# Altium PCB OmniCore_SDR.PcbDoc (part 13 of 13)
Units mil, origin at the board's own origin, x right, y up, seen from the top; angles counter-clockwise.
Board outline 4724.72 x 2755.91 mil, 8 copper layers (Top, GND 1, Layer 1, Layer 2, GND 2, Layer 3, Power, Bottom), stack 40.468 mil thick; 530 components, 427 nets, 2315 pads, 1715 vias.
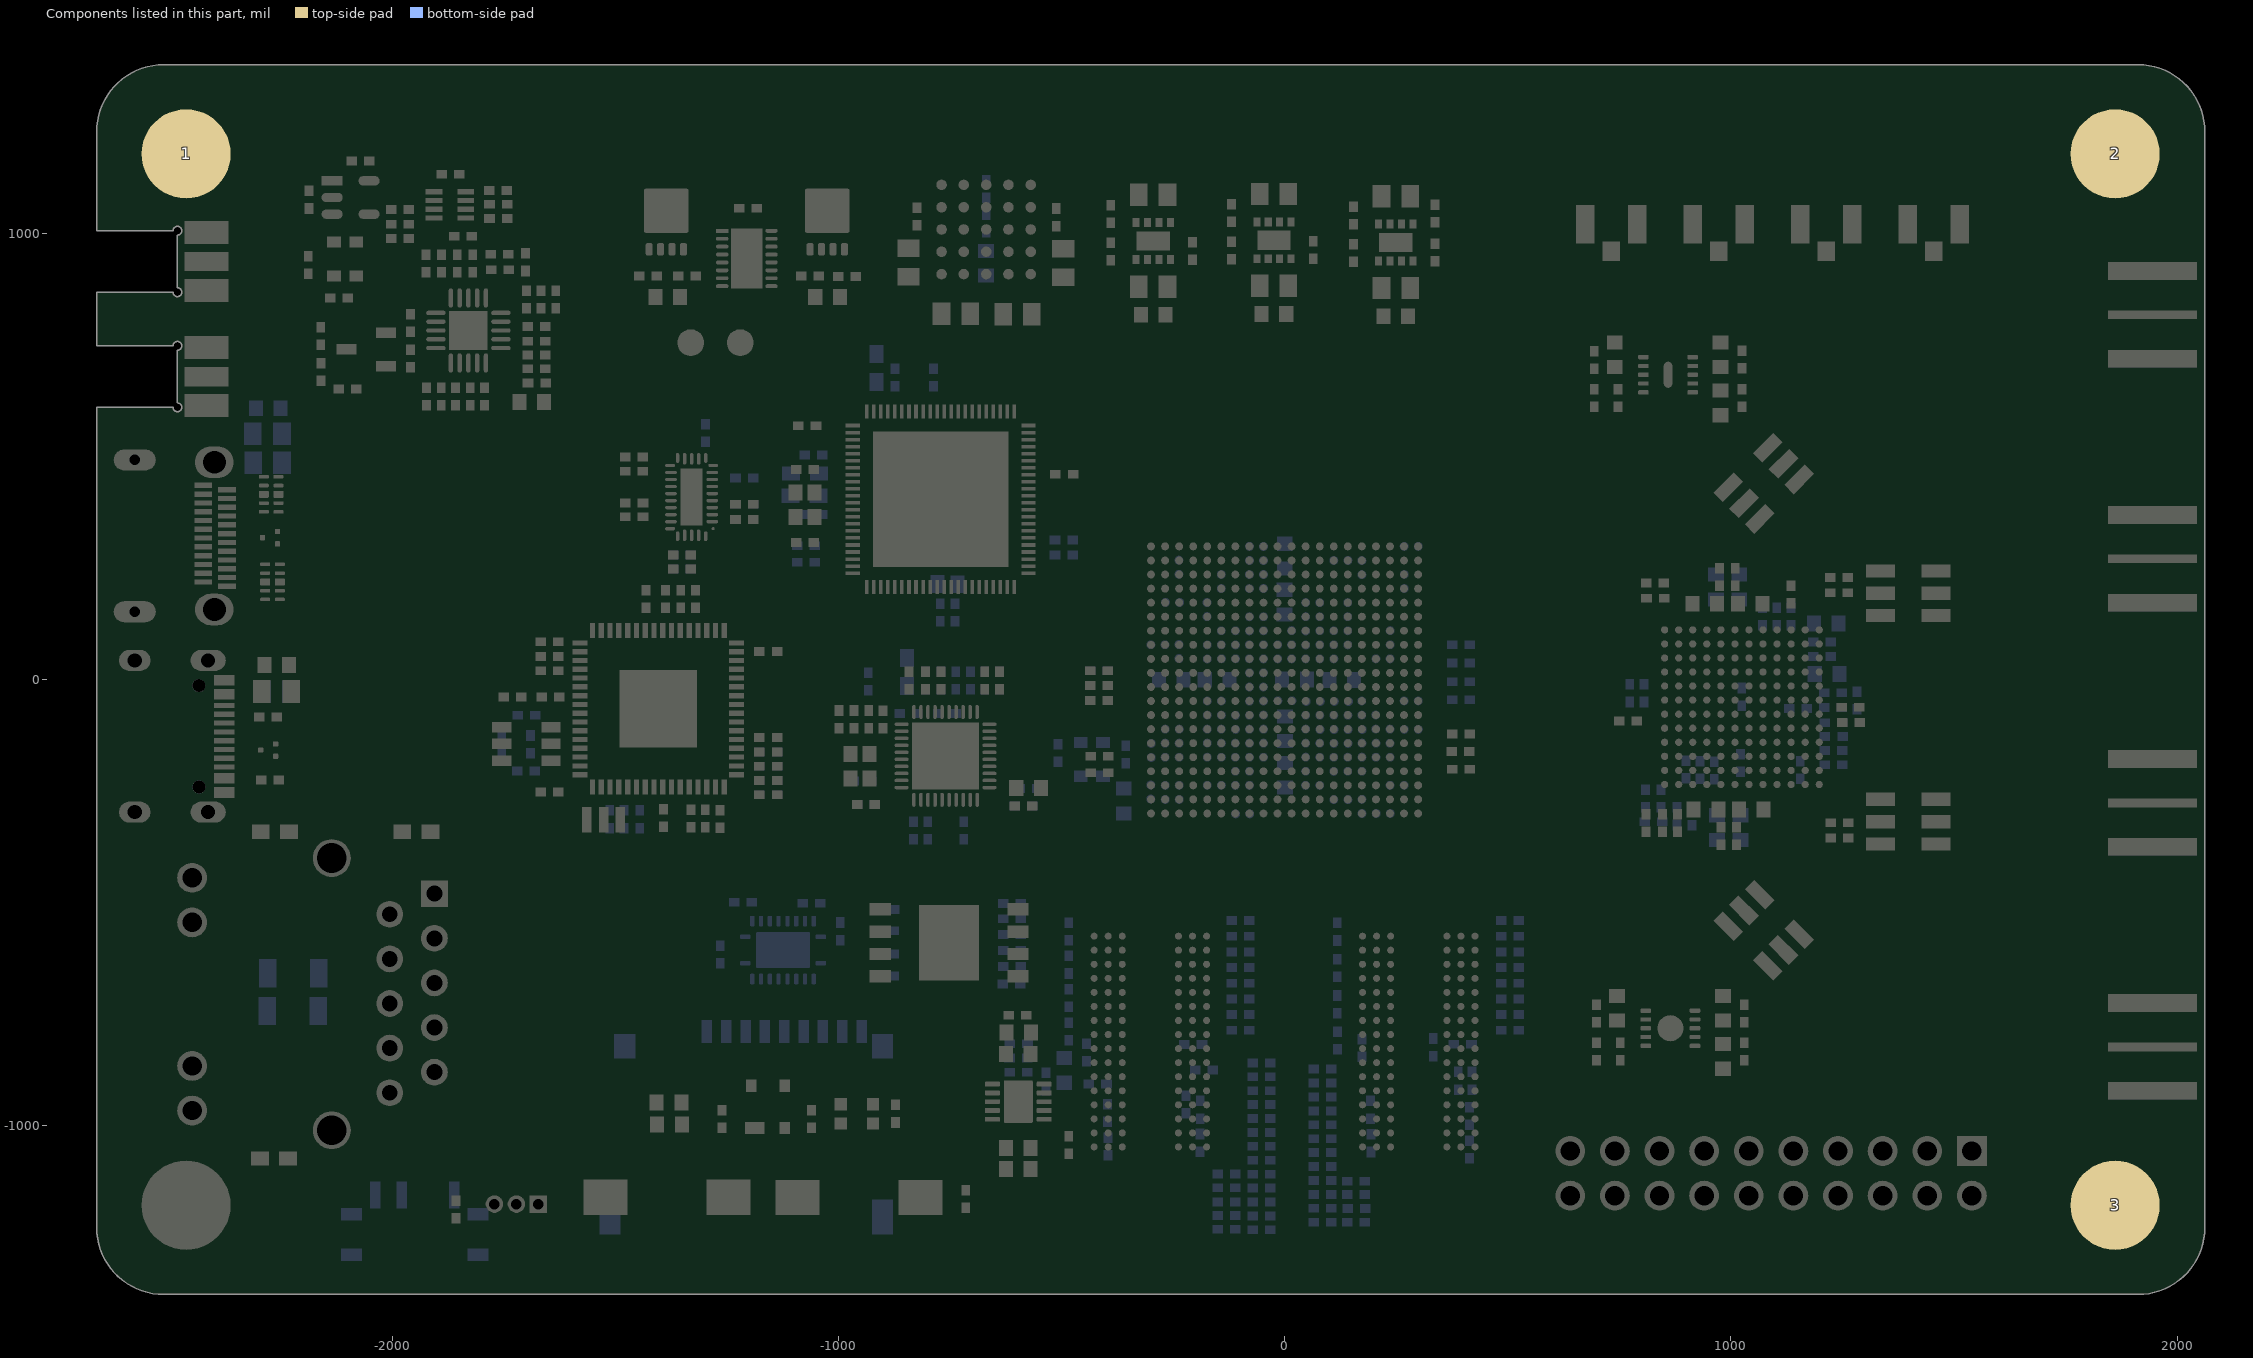
[diagram p18: the components of this part, seen from the top]

## Other copper
Top:
  rectangle net GND: 826.7,607.93 893.09,758.13
  rectangle net GND: 831.91,-856.6 898.3,-706.4
  pour cut-out: -2089.17,707.57 -2089.17,669.27 -2090.56,670.66 -2120.03,670.66 -2120.03,689.97 -2111.23,698.77
  pour cut-out: -2023.3,-449.4 -1869.2,-449.4 -1868,-448.2 -1865.55,-450.66 -1865.55,-503.56 -1396.66,-503.56 -1223,-329.9 -1223,-328 -1192,-297 -1187.7,-301.3 -768.75,-301.3 -768.75,-309.35 -711.9,-366.2 -722.9,-377.2 -722.9,-422.6 -1122.6,-422.6 -1365,-665 -1583.2,-665 -1583.2,-668.1 -1832.9,-917.8 -1947.7,-917.8 -2009.3,-856.2 -2011.01,-857.91 -2051.31,-857.91 -2047.8,-854.4 -2047.8,-447.9
  pour cut-out: 583.98,-231.1 483.56,-130.68 475.7,-130.68 475.7,-231.1 475.6,-231.2
  pour cut-out: -1561.9,91.7 -1560.67,90.47 -1251.46,90.47 -1251.46,-219.44 -1257.79,-213.11 -1564.92,-213.11
  pour cut-out: -728.52,-438.3 -727.92,-438.9 -675.9,-438.9 -675.9,-514.22 -675.05,-515.07 -674.98,-515 -597.7,-515 -597.7,-503.9 -580.6,-486.8 -674.95,-392.45 -681.35,-392.45
  pour cut-out: -1111.5,564 -1111.5,328.35 -1116.5,323.35 -1003,323.35 -1003,561.6 -1000,564.6
  pour cut-out: 325.21,32 475.7,-118.49 475.7,-1100.7 -464.6,-1100.7 -464.6,-602.58 -785.91,-281.27 -1189.66,-281.27 -1189.66,28.67 -1313.25,152.26 -1313.25,323.35 -1003,323.35 -1003,555.4 -971.7,586.7 -606.1,586.7 -606.1,615.9 -586,636 -543,636 -304.7,397.7 -304.7,36.2
  pour cut-out: 650.03,132.62 652.24,130.4 896.52,130.4 896.52,-217.04 911.52,-232.04 588.7,-232.04 588.7,62.8 583.03,68.47
  pour cut-out: 46.22,528.22 46.22,508.18 162.6,391.8 162.6,308.7 57.27,308.7 47,298.43
  pour cut-out: 250.49,325.72 265.29,340.52 334.6,340.52 437.21,237.91 437.21,99.02 433.31,102.92 253.84,102.92
  pour cut-out: -100.7,565.1 -94.35,565.1 -74.96,584.49 12.02,497.5 15.5,497.5 15.5,338.8 14.8,338.1 -45.8,338.1 -45.8,508.8 -47.49,510.49
  region net GND: 281.1,1000.2 281.9,1001 389.8,1001 389.8,833.3 352.9,796.4 261.4,796.4 261.4,900.6 262.1,901.3 306.4,901.3 306.7,901 352.4,901 356.5,905.1 356.5,953.2 351.7,958 281.85,958
  region net GND: 6,1006.5 51.04,1006.5 56.34,1011.8 56.34,1053.7 37.14,1072.9 37.14,1100.24 71.4,1134.5 213.6,1134.5 245.2,1102.9 245.2,999 228.2,999 228.2,1036.2 210.7,1053.7 179,1053.7 165.8,1040.5 134.5,1040.5 134.5,797.8 -8.14,797.8 -8.14,914.7 77.24,914.7 85.24,922.7 85.24,963.9 5.39,963.9
  region net GND: -264.8,1004.4 -223,1004.4 -213.9,1013.5 -214.4,1014 -214.4,1055.9 -233.6,1075.1 -233.6,1101.6 -200.9,1134.3 -57.5,1134.3 -28.89,1105.69 -28.89,1004.69 -28.7,1004.5 -44.9,1004.5 -44.9,1045.9 -56.7,1057.7 -98.1,1057.7 -109.6,1046.2 -138.8,1046.2 -138.8,800 -281,800 -281,916.9 -193.5,916.9 -185.5,924.9 -185.5,962.7 -264.9,962.7 -265.4,962.2
  region net GND: -298.1,1002.2 -298.3,1002.4 -298.3,1105.9 -326.9,1134.5 -374.6,1134.5 -404.1,1105 -404.1,1052.2 -322.5,1052.2 -315.5,1045.2 -315.5,1002.2
  region net 1V8: 814.3,726.5 722.3,726.5 706.3,710.5 653.3,710.5 653.3,678.5 815.3,678.5
  region net VDD_DIG: 903.3,727.5 996.3,727.5 1013.3,710.5 1071.3,710.5 1071.3,677.5 903.3,677.5
  region net 5V_USB2: -2249,-56 -2187,-56 -2187,101 -2249,101
  region net USB3_VBUS: -2402.12,270 -2502,270 -2525,293 -2525,361 -2501,385 -2402.12,385 -2402.12,367 -2482,367 -2500,349 -2500,304 -2482,286 -2402.12,286
  region net GND: -2272,-241 -2266,-235 -2266,-215 -2242,-215 -2238,-219 -2238,-283 -2260,-305 -2340,-305 -2380,-265 -2399,-265 -2399,-241
  region net GND: -2336,-13 -2312,11 -2270,11 -2270,51 -2335,51 -2375,11 -2400,11 -2400,-12 -2401,-13
  region net NetJ5_A4: -2354,-210 -2401,-210 -2419,-192 -2419,-62 -2401,-44 -2328,-44 -2319,-53 -2272,-53 -2272,-1 -2312,-1 -2331,-20 -2411.12,-20 -2446,-54.88 -2446,-200 -2412,-234 -2354,-234
  region net 3V3: -555,-906.63 -555,-901 -551,-901 -546,-896 -546,-833 -521,-833 -521,-906.63
  region net 1V35: -607,-741 -607,-857 -644,-857 -679,-892 -679,-913 -672,-920 -638,-920 -638,-933 -714,-933 -714,-785 -670,-741
  region net DDRVTT: -638,-951 -638,-940 -714,-940 -714,-1075 -673,-1116 -606,-1116 -606,-1032 -627,-1032 -637,-1022 -637,-981 -638,-980 -670,-980 -678,-972 -678,-958 -671,-951
  region net 5V: 288,1235 361,1235 388,1208 388,1052 288,1052
  region net 5V: -1453,1235 -1462,1235 -1495,1202 -1495,1033 -1466,1004 -1451,1004
  region net 5V: -1462,1004 -1320,1004 -1320,1080 -1107,1080 -1107,1003 -950,1003 -949,1002 -949,1116 -924,1141 309,1141 306.98,1235 -1462,1235
  region net 5V: -1143.5,1080.5 -1106.5,1043.5 -1106.5,1080.5
  region net 5V: -1321.5,1044 -1284.5,1081 -1321.5,1081
  region net 5V: 217,1142 254,1105 254,1142
  region net 5V: -56,1142 -19,1105 -19,1142
  region net 5V: -326,1142 -289,1105 -289,1142
  region net 5V: 31,1105 68,1142 31,1142
  region net 5V: -240,1105 -203,1142 -240,1142
  region net 5V: -413,1105 -376,1142 -413,1142
  region net 5V: -847.5,1106.5 -810.5,1143.5 -847.5,1143.5
  region net 5V: -525,1144 -488,1107 -488,1144
  region net 1V8: 219.56,1009.69 219.56,1037.68 211.56,1045.69 179.56,1045.69 171.56,1037.69 171.56,957.69 164.56,950.69 143.56,950.69 141.56,948.69 141.56,797.2 239.56,797.2 239.56,901.69 218.56,922.69 218.56,947.69 217.56,948.69 204.56,948.69 204.56,1009.69
  region net 1V35: -53.44,1014.69 -53.44,1042.68 -61.44,1050.69 -93.44,1050.69 -101.44,1042.69 -101.44,962.69 -108.44,955.69 -129.44,955.69 -131.44,953.69 -131.44,799.68 -33.44,799.68 -33.44,906.69 -54.44,927.69 -54.44,952.69 -55.44,953.69 -68.44,953.69 -68.44,1014.69
  region net 3V3: -324,1013 -324,1041 -330.6,1047.6 -365.4,1047.6 -372,1041 -372,961 -379,954 -400,954 -402,952 -402,798 -304,798 -304,905 -325,926 -325,951 -326,952 -339,952 -339,1013
  region net 1V0: -634,932 -536,932 -536,791 -589,791 -589,851 -596,858 -622,858 -634,870
  region net 1V0: -702,933 -805,933 -805,792 -747,792 -747,852 -740,859 -714,859 -702,871
  region net GND: -676,980 -657,980 -641,964 -641,863 -622,844 -610,844 -610,789 -725,789 -727,789 -727,845 -705.82,845 -692,862.47 -692,964
  region net 5V: -846,996 -846,1169 -949,1169 -970,1148 -970,1003 -928,1003 -868,943 -697,943 -697,1022 -707,1032 -733,1032 -741,1024 -741,1001 -753,989 -839,989
  region net 5V: -490,988 -490,1168 -487,1171 -412,1171 -411,1170 -411,974 -443,942 -634,942 -634,1018 -626,1026 -603,1026 -594,1017 -594,999 -583,988
  region net 5V: -17.44,1015.69 -2.44,1015.69 -2.44,1035.69 22.56,1060.69 31.56,1069.69 31.56,1159.69 31.42,1159.55 -20.44,1159.55 -20.44,1015.69
  region net 5V: 255.56,1010.69 270.56,1010.69 270.56,1030.69 295.56,1055.69 309.47,1069.6 308.5,1154.55 252.56,1154.55 252.56,1010.69
  region net 5V: -288,1014 -273,1014 -273,1034 -248,1059 -239,1068 -239,1158 -239.14,1157.86 -291,1157.86 -291,1014
  region net 5V_USB2: -1030,894 -1030,920 -1001,949 -1001,990 -1111,990 -1111,962 -1116,957 -1163,957 -1163,946 -1087,946 -1058,917 -1058,894
  region net 5V_USB3: -1344,893 -1344,926 -1363,945 -1363,991 -1476,991 -1476,943 -1396,943 -1375,922 -1375,893
  region net 1V8: 819.51,-738.03 727.51,-738.03 711.51,-754.03 658.51,-754.03 658.51,-786.03 820.51,-786.03
  region net VDDA_RX_LO: 907.91,-736 996.09,-736 1013.09,-753 1075.91,-753 1075.91,-786 907.91,-786
GND 1:
  pour cut-out: 1320.42,-787.3 cw(c1320.42,-687.3) 1249.71,-758.01 1077.6,-585.9 1025.8,-637.7 1228.24,-840.14 ccw(c1310.83,-709.65) 1274.31,-859.7 2052.01,-859.7 2052.01,-787.3
  pour cut-out: 2010.6,-241.9 2010.5,-242 1735.04,-242 ccw(c1735.03,-347.09) 1660.71,-272.79 1622,-311.5 cw(c1559.66,-241.25) 1577.9,-333.38 1417.61,-333.38 1417.61,-403.7 1587.33,-403.7 ccw(c1580.79,-286.11) 1668.56,-364.64 1699.82,-333.38 cw(c1747.57,-381.13) 1747.58,-313.6 2052.01,-313.6 2052.01,-241.9
  pour cut-out: 1758.2,306.6 ccw(c1760.92,187.78) 1674.95,269.85 1596.34,191.24 cw(c1564.83,225.17) 1563.1,178.9 1417.6,178.9 1417.6,108.6 1564.57,108.6 ccw(c1562.79,238.53) 1659.98,152.29 1728.18,220.48 cw(c1759.6,189.07) 1759.61,233.5 2052.01,233.5 2052.01,306.6 2011.9,306.6
  pour cut-out: 1551.8,853 ccw(c1565.35,714.05) 1457.5,802.7 1095.85,441.05 1147.65,389.25 1516.93,758.53 cw(c1571.96,708.82) 1568.57,782.9 2052.01,782.9 2052.01,853
  pour cut-out: 1309.95,243.45 1194.45,243.45 1158.1,207.1 1158.1,101.6 1205.1,101.6 1205.1,174 1211.8,180.7 1264.85,180.7 1309.63,135.92
  pour cut-out: 1298.85,262.4 1371.6,262.4 1371.6,224.4 1298.85,224.4
  pour cut-out: 964.77,197.84 964.77,260.99 984.5,260.99 984.5,197.84
  pour cut-out: 999.77,197.74 999.77,260.89 1019.5,260.89 1019.5,197.74
  pour cut-out: 967.37,-382.06 967.37,-318.91 987.1,-318.91 987.1,-382.06
  pour cut-out: 1002.67,-382.36 1002.67,-319.21 1022.4,-319.21 1022.4,-382.36
  pour cut-out: 1310.06,-260.04 1263.9,-306.2 1216.5,-306.2 1208.3,-298 1208.3,-230.1 1202,-223.8 1201.8,-224 1162.8,-224 1155.1,-231.7 1155.1,-331.3 1192.35,-368.55 1309.95,-368.55
  pour cut-out: 954.59,417.49 1007.6,470.5 1033.45,444.65 980.44,391.64
  pour cut-out: 1077.4,-522.1 1023.84,-468.54 1051.74,-440.64 1105.3,-494.2
  pour cut-out: 1299.04,-349.44 1371.8,-349.44 1371.8,-387.44 1299.04,-387.44
  pour cut-out: 1299.04,-249.44 1371.8,-249.44 1371.8,-287.44 1299.04,-287.44
  pour cut-out: 1299.03,162.56 1371.78,162.56 1371.78,124.56 1299.03,124.56
  pour cut-out: -1493.42,410.2 -1422.2,410.2 -1422.2,351.6 -1493.18,351.6
  pour cut-out: -1493.52,512.9 -1422.6,512.9 -1422.6,453.2 -1493.28,453.2
  pour cut-out: 898.32,187.91 984.7,187.91 984.7,152.61 898.8,152.61
  pour cut-out: 1000.56,188.34 1086.94,188.34 1086.94,153.04 1001.04,153.04
  pour cut-out: 900.41,-273.4 987.8,-273.4 987.8,-309.1 900.9,-309.1
  pour cut-out: 1002.02,-273.5 1088.4,-273.5 1088.4,-308.8 1002.5,-308.8
  pour cut-out: 1024.62,348.32 1077.05,400.75 1104.6,373.2 1052.17,320.77
  pour cut-out: 1005.5,-592.4 953.58,-540.48 982.38,-511.68 1034.3,-563.6
Layer 1:
  pour cut-out: -1161.9,-681.3 -1154.6,-674 -1086,-674 -1035,-725 -1047.25,-737.25 -1047.25,-747 -1136.94,-747 -1166.9,-717.04 -1166.9,-713 -1164.7,-715.2
  pour cut-out: -606.83,617.85 -557.81,617.85 -538.77,636.88 -524.8,622.9 -524.8,435 -592.3,435 -596,431.3 -602.79,438.09
  pour cut-out: -643.31,242.54 -607.66,242.54 -556.61,293.59 -556.61,224.5 -575,224.5 -620.98,178.52 -645.96,178.52
  pour cut-out: -874.3,-403.1 -868.7,-408.7 273.3,-408.7 436,-246 650.2,-246 680.4,-276.2 677.34,-279.26 677.34,-787.7 559.04,-787.7 540.14,-806.59 531.52,-797.97 -515.55,-797.97 -602.77,-710.75 -908.28,-710.75 -908.28,-417.28 -902.6,-411.6
  pour cut-out: -902.8,-472 -900.5,-474.3 -543.6,-474.3 -530.2,-487.7
  pour cut-out: -819.5,-263.4 -671.9,-263.4 -586.5,-178 -582.5,-182 -426.1,-182 -426.1,-356.66 -543.74,-474.3 -917.7,-474.3 -917.7,-350.6 -881.4,-314.3
  pour cut-out: -440.5,585.5 -377.8,648.2 -296.12,648.2 -276.92,629 -358.42,547.5 -440.5,547.5
  pour cut-out: -575.9,61.4 -229.58,61.4 -189.22,21.04 -189.22,-63.78 -307.88,-63.78 -426.1,-182 -664,-182 -664,0.4 -661.5,2.9
  pour cut-out: -462,258 -453.71,249.71 -266.71,249.71 -266.71,215.93 -340.64,142 -361.34,162.7 -465.7,162.7
  pour cut-out: -71.9,-176.2 17.45,-176.2 199.17,-357.92 299.02,-357.92 438.66,-497.56 438.66,-797.72 -450.73,-797.72 -454.2,-794.26 -454.2,-391.75 -236.45,-174
  pour cut-out: -413.8,-193.7 -337.81,-193.7 -293.76,-237.76 -392.4,-336.4 -417.2,-336.4
  pour cut-out: 355.6,323.1 358.7,320 831.93,320 1119.3,32.63 1119.3,-159.3 987.4,-291.2 366.28,-291.2
  region net 5V_USB2: -2187,-56 -2187,109 -2217,139 -2217,527 -2140,604 -1571,604 -1448,727 -1158,727 -1001,884 -1001,990 -1111,990 -1111,946 -1110,945 -1086,945 -1071.3,930.3 -1071.3,900.7 -1187,785 -1480,785 -1604,661 -2182,661 -2278,565 -2278,118 -2249,89 -2249,-56
Layer 2:
  pour cut-out: -920.6,38.5 -1020.6,38.5 -1020.6,-47.6 -981.6,-86.6 -794.7,-86.6
  pour cut-out: -2312.42,355.02 -2233.3,275.9 -2233.3,266.74 -2288.72,266.74 -2322.5,300.52 -2322.5,319.4
  pour cut-out: -545.58,587 -545.58,319.18 -519.8,293.4 -436.3,293.4 -436.3,323.2 -367.5,392 -381.1,405.6 -381.1,596.3 -544.4,596.3 -545.9,597.8
  pour cut-out: -428.51,456.51 -428.51,600.99 -423.5,606 446,606 446,598.7 805.3,239.4 805.3,90.3 -62.3,90.3
  pour cut-out: -465.4,-531.9 -456.26,-541.04 -456.26,-792.2 -334.85,-792.2 -334.85,-1231.09 321.87,-1231.09 335.64,-1217.32 335.6,-1217.27 335.6,-810.8 397.6,-810.8 453.8,-754.6 449.5,-750.3 449.5,-527.7
  pour cut-out: -479,-487 -479,-486.5 -380.7,-388.2 -329.4,-439.5 -329.4,-449.3 -435.5,-555.4 -500.3,-490.6 -500.3,-486.2
  pour cut-out: -107.1,-689.2 4.38,-689.2 108.8,-793.62 108.8,-1181.7 33.42,-1257.08 -49.94,-1257.08 -49.94,-1224.06 -137.9,-1136.1 -137.9,-690.3
  pour cut-out: -1285.23,-551.73 -1287.2,-553.7 -1289.4,-551.5 -1289.4,-521.9 -1285.72,-521.9 -1239.32,-475.5 -1164.5,-475.5 -1164.5,-538 -1178.23,-551.73 -1228.07,-551.73
  pour cut-out: -1056,-367 -1018.26,-367 -1014.2,-371.06 -1014.2,-399.7 -1035.8,-399.7 -1103.8,-467.7 -1130,-441.5 -1130,-439.3
  pour cut-out: -669,181 -658,170 -442,170 -442,114.73 -447.02,109.71 -450.31,113 -658,113 -685.6,140.6 -685.6,179.6
  pour cut-out: 651.46,-859.4 758.8,-966.74 758.8,-987.6 651.1,-987.6 626.5,-963 626.5,-859.6 626.3,-859.4
  pour cut-out: -310.4,346.7 -242.4,414.7 382,414.7 714.2,82.5 1161.4,82.5 1197.48,46.42 1197.48,-182.02 1087.9,-291.6 682.6,-291.6 682.6,-484.84 640.01,-527.43 -198.47,-527.43 -411.7,-314.2 -410.1,-312.6 -410.1,345.1
Layer 3:
  pour cut-out: -340.17,-1245.09 -340.17,-219.6 -293.84,-173.27 -293.3,-173.8 235,-173.8 336.1,-274.9 336.1,-1253 -332.26,-1253
  pour cut-out: 660.2,-243.2 569.65,-333.75 318.3,-333.75 318.3,81.2 325.7,88.6
  pour cut-out: -1032,-149 -470.71,-149 -446.45,-173.27 -491.08,-217.9 -571.4,-217.9 -571.4,-224.8 -623.6,-277 -849,-277 -882,-310 -1114,-310 -1114,-231 -1110,-227
  pour cut-out: -1558.8,252.9 -1401.8,252.9 -1381.66,232.76 -1381.66,200.34 -1397,185 -1534.1,185 -1581.9,232.8 -1578.2,236.5 -1578.2,258.8
  pour cut-out: -1201,-6 -1198.9,-6 -1107.1,-97.8 -1110,-100.7 -1110,-237.6 -1127,-254.6 -1128.4,-253.2 -1162.7,-253.2 -1162.7,-244.3 -1214,-193 -1214,-5.2
  pour cut-out: -931.32,34.67 -931.32,-37.18 -913.5,-55 -589,-55 -589,-45.6 -542.5,0.9 -576,34.4 -639.2,34.4
  pour cut-out: -677,249 -556,249 -532,225 -532,176.6 -695.8,176.6 -700.6,181.4 -698.6,183.4 -698.6,244.2
  pour cut-out: -346.68,109.19 -211.59,109.19 -211.2,108.8 -220.93,99.07 -220.93,-1 -364,-1 -359.26,3.74 -359.26,113.46
  pour cut-out: -231.9,359.8 -228.2,363.5 -75.4,363.5 -31.74,319.84 -31.74,282.68 -32,282.68 -100.88,213.8 -367.33,213.8 -392.14,238.6 -373.8,256.94 -373.8,360.8
  pour cut-out: 332.72,-319.33 332.72,42.32 374.5,84.1 700.1,-241.5 1118.2,-241.5 1156.4,-203.3 1146.47,-193.37 1146.47,144.27 881.74,409 34.65,409 -10.63,454.28 -16.4,448.51 -16.4,165.5 140.1,165.5 241.8,63.8 241.8,-320.4
Power:
  pour cut-out: -2447.38,838.3 -2447.8,837.88 -2447.8,760.8 -2638.3,760.8 -2643,765.5 -2641.4,767.1 -2641.4,842
Bottom:
  rectangle net GND: -1847.2,-1322 -1760.9,-1258.9
  rectangle net GND: -2135.3,-1319.5 -2045.1,-1261.8
  rectangle net NetC233_1: -2185,-1055 -2093,-354
  pour cut-out: -452.7,-1084 -168.68,-1084 -149.68,-1103 -154.5,-1107.81 -154.5,-1243.6 -325,-1243.6 -463.4,-1105.2 -463.4,-1094.7
  pour cut-out: -491.3,-184 -487.85,-180.55 -475,-180.55 -475,-254.94 -482.06,-262 -506.42,-262
  pour cut-out: -291.18,-329.88 -289.67,-331.39 334.11,-331.39 334.11,253.27 335.2,254.37 335.2,288.5 -295.15,288.5 -304.32,297.68
  pour cut-out: -464.16,-529.34 -155.76,-529.34 -145.1,-540 -149.68,-544.59 -149.68,-1084 -452.7,-1084 -463.4,-1094.7
  pour cut-out: 98.16,-523.5 99.36,-524.71 463.5,-524.71 463.5,-1082.1 454.33,-1091.27 104.37,-1091.27
  pour cut-out: 993,-61 1045.5,-61 1050.7,-66.2 1047.8,-69.1 1047.8,-170.2 968.9,-170.2 965.2,-166.5
  pour cut-out: 856.7,16.95 857.2,16.45 857.2,-96.4 944.26,-96.4 969.5,-71.16 969.5,-10.8 932.8,25.9 861.6,25.9
  pour cut-out: -475.4,-152.5 -420.5,-152.5 -385.32,-187.68 -389.6,-191.97 -389.6,-214.9 -468.3,-214.9 -474.6,-208.6
  pour cut-out: -307,310 -216.68,219.68 -157.72,219.68 -157.72,-74.02 -220.2,-136.5 -546,-136.5 -546,-88 -493.1,-35.1 -493.1,95.3 -492.56,95.3 -445.86,142 -386,142 -386,160 -345,201 -346.4,202.4 -346.4,266.5
  pour cut-out: 960.33,154.15 960.33,84.36 958.17,82.2 993.02,47.34 1106.36,47.34 1106.36,143.64 1095,155
  region net 5V_USB3: -2227,461 -2195,493 -1685,493 -1481,697 -1481,920 -1458,943 -1363,943 -1363,991 -1494,991 -1544,941 -1544,747 -1733,558 -2152,558 -2224,630 -2270,630 -2270,461
  region net USB3_VBUS: -2475.11,399.11 -2460,384 -2443,384 -2443,367 -2484.29,367
  region net USB3_VBUS: -2482,286 -2482,270 -2502,270 -2525,293 -2525,361 -2505,381 -2505,512 -2447,570 -2294,570 -2294,534 -2434,534 -2475,493 -2475,373 -2500,348 -2500,304 -2490,294
  region net USB3_VBUS: -2354,561 -2336,579 -2301,579 -2294,572 -2294,531 -2300,525 -2336,525 -2354,543
  region net 3V3: -546,-893 -522,-893 -522,-870 -516,-864 -476,-864 -476,-833 -546,-833

## Silkscreen, mask and mechanical layers (free items; w line width, h text height)
Top Overlay:
  drawing of 183 lines, arcs and shapes, not listed
  text "TX_LO" at 881.3,1106.68 h70
  text "TRIG" at 662.3,1106.34 h70
  text "SYNC" at 1129.07,1106.24 h70
  text "RX_LO" at 1353.3,1106.28 h70
  text "TX1" at 1662.1,880.1 h100
  text "PPS_IN" at -2295.18,836.1 h65 r90
  text "OmniCore SDR" at -436.37,615.83 h140
  text "LOCK" at -1632.31,607.9 h40
  text "10M_IN" at -2295.72,576.7 h65 r90
  text "RX1" at 1662.1,333.9 h100
  text "RX2" at 1662.1,-212.3 h100
  text "LAN_1000Mbps" at -2220.1,-285.82 h65
  text "TX2" at 1662.1,-758.5 h100
  text "开放实验室" at -1158.83,-809.98 h72
  text "Club" at -833.78,-811.42 h60
  text "电子实验中心" at -1589.2,-813.32 h70
  text "DONE" at -1431.6,-910.62 h40
  text "RGB" at -994.7,-910.62 h40
  text "PL_KEY" at -1067.2,-1067.32 h65
  text "FAN" at -1771.6,-1073.04 h65
  text "RESET" at -1479.3,-1073.82 h65
  text "OMNICORE-SDR_Rev2.6-α Designed by LiRen" at -665.3,-1179.83 h60
  text "USER_IO" at 1646.5,-1221.04 h60 r90
Bottom Overlay:
  lines w10: -2005.2,-1110.2 -2005.2,-1027 ; -2085.6,-1111.2 -1818.4,-1111.2 -1818.4,-1025.1 -2085.6,-1025.1 -2085.6,-1111.2
  text "SD_CARD" at -1057.27,-736.72 h70
  text "FLASH" at -1824.4,-1086.3 h58
  text "SD" at -2010.59,-1086.7 h58
Top Solder:
  rectangle: 1559,219.2 1604,733.6
  rectangle: 1559,-285.1 1604,71.8
  rectangle: 1559,-960.3 1604,-867.62
  region: 1603.5,840.1 1603.5,885.1 1398.4,885.1 1398.4,840.1
  region: 1603.8,-960.7 1603.8,-915.7 1398.1,-915.7 1398.1,-960.7
  region: 1313.38,-960.7 1313.38,-915.7 1013.38,-915.7 1013.38,-960.7
  region: 928.65,-960.7 928.65,-915.7 574.7,-915.7 574.7,-960.7
  region: 1313.68,840.1 1313.68,885.1 1013.68,885.1 1013.68,840.1
  region: 928.95,840.1 928.95,885.1 574.5,885.1 574.5,840.1
  rectangle: 1559,-764 1604,-425.6
  rectangle: 574.7,252.4 619.7,493.88
  rectangle: 574.7,-575.57 619.7,-247.9
  rectangle: 574.7,-960.3 619.7,-660.3
  rectangle: 574.7,578.6 619.7,878.6
  region: 2063.57,960.8 1912.63,960.8 1605,1269.3 -2201.9,1269.3 -2421.3,1056.8 -2662.3,1056.8 -2662.4,1050 -2662.4,1227.76 cw(c-2512.36,1227.76) -2512.36,1377.8 1912.36,1377.8 cw(c1912.36,1227.56) 2062.6,1227.56 2062.6,1159.1
  region: -2663.3,-1057 -2662.8,-1057 -2417.1,-1057 -2205.2,-1269.5 1601.7,-1269.5 1912.89,-968.1 2062.2,-968.1 2062.2,-1227.96 cw(c1912.16,-1227.96) 1912.16,-1378 -2512.16,-1378 cw(c-2512.16,-1227.36) -2662.8,-1227.36 -2662.8,-1159.3
  lines w30: -1519.7,1033.2 -1519.7,866.7 ; -1519.7,1047.2 -1519.7,866.7 ; -1519.7,1058 -1519.7,1052.6 -1519.7,866.7 ; 1083.3,-640.6 ccw(c1085.71,-640.6) 1084.01,-642.31 1235.38,-793.68 ccw(c1305.92,-723.14) 1305.92,-822.9 1842.5,-822.9 ; 1148.12,443.62 1493.27,787.54 cw(c1567.32,713.49) 1567.32,818.21 1843.19,817.16 ; 1148.6,442.6 cw(c1150.05,442.6) 1149.02,443.62 ; 1476.1,143.3 1560.16,143.04 ccw(c1560.16,246.71) 1633.47,173.4 1702.7,242.5 cw(c1770.3,174.9) 1770.3,270.5 1840.7,270.5 ; 1476.9,-369.8 cw(c1479.56,-372.46) 1479.56,-368.7 1574.41,-368.7 ccw(c1574.41,-276.02) 1639.95,-341.55 1677.2,-304.3 cw(c1745.52,-372.62) 1745.52,-276 1842.3,-276 ; -1519.7,866.7 -1519.7,1070.5 -1652.1,1202.9 -2146.7,1202.9 -2238,1111.6 -2238,728.6 -2238,624 -2113.7,499.7 -1638.4,499.7 -1519.7,618.4 -1519.7,866.7
Bottom Solder:
  region: -2663.3,-1057 -2662.8,-1057 -2417.1,-1057 -2205.2,-1269.5 1601.7,-1269.5 1913.92,-967.1 2062.2,-967.1 2062.2,-1227.96 cw(c1912.16,-1227.96) 1912.16,-1378 -2512.16,-1378 cw(c-2512.16,-1227.36) -2662.8,-1227.36 -2662.8,-1159.3
  region: 2063.56,963.2 1910.24,963.2 1605,1269.3 -2201.9,1269.3 -2421.3,1056.8 -2662.3,1056.8 -2662.4,1050 -2662.4,1227.76 cw(c-2512.36,1227.76) -2512.36,1377.8 1912.36,1377.8 cw(c1912.36,1227.56) 2062.6,1227.56 2062.6,1159.1
Mechanical 1:
  lines w5: -2662.2,1005.91 -2662.52,1005.91 ; -2662.52,1005.91 -2662.52,1227.95 -2662.2,1227.95 cw(c-2512.2,1227.95) -2512.2,1377.95 1912.2,1377.95 cw(c1912.2,1227.95) 2062.2,1227.95 2062.2,-1227.95 cw(c1912.2,-1227.95) 1912.2,-1377.95 -2512.2,-1377.95 cw(c-2512.2,-1227.95) -2662.2,-1227.95 ; -2662.52,1005.91 -2491.26,1005.91 cw(c-2481.42,1005.91) -2481.42,996.06 -2481.42,877.95 cw(c-2481.42,868.11) -2491.26,868.11 -2662.2,868.11 -2662.2,747.91 -2491.26,747.91 cw(c-2481.42,747.91) -2481.42,738.07 -2481.42,619.96 cw(c-2481.42,610.12) -2491.26,610.12 -2662.2,610.12 -2662.2,-1227.95 ; -2662.2,-1227.95 -2662.2,-1227.95

## Text inside footprints (layer, text, board x,y; h text height)
J3: Top Courtyard "PCB Cutout" at -2579.84,738.07 h20 r270
J6: Top Courtyard "PCB Cutout" at -2579.84,996.06 h20 r270